# Altium PCB MotorDriver-v1.0.PcbDoc (part 1 of 3)
Units mil, origin at the board's own origin, x right, y up, seen from the top; angles counter-clockwise.
Board outline 4842.52 x 3661.42 mil, 2 copper layers (Top Layer, Bottom Layer), stack 57 mil thick; 127 components, 90 nets, 380 pads, 96 vias.
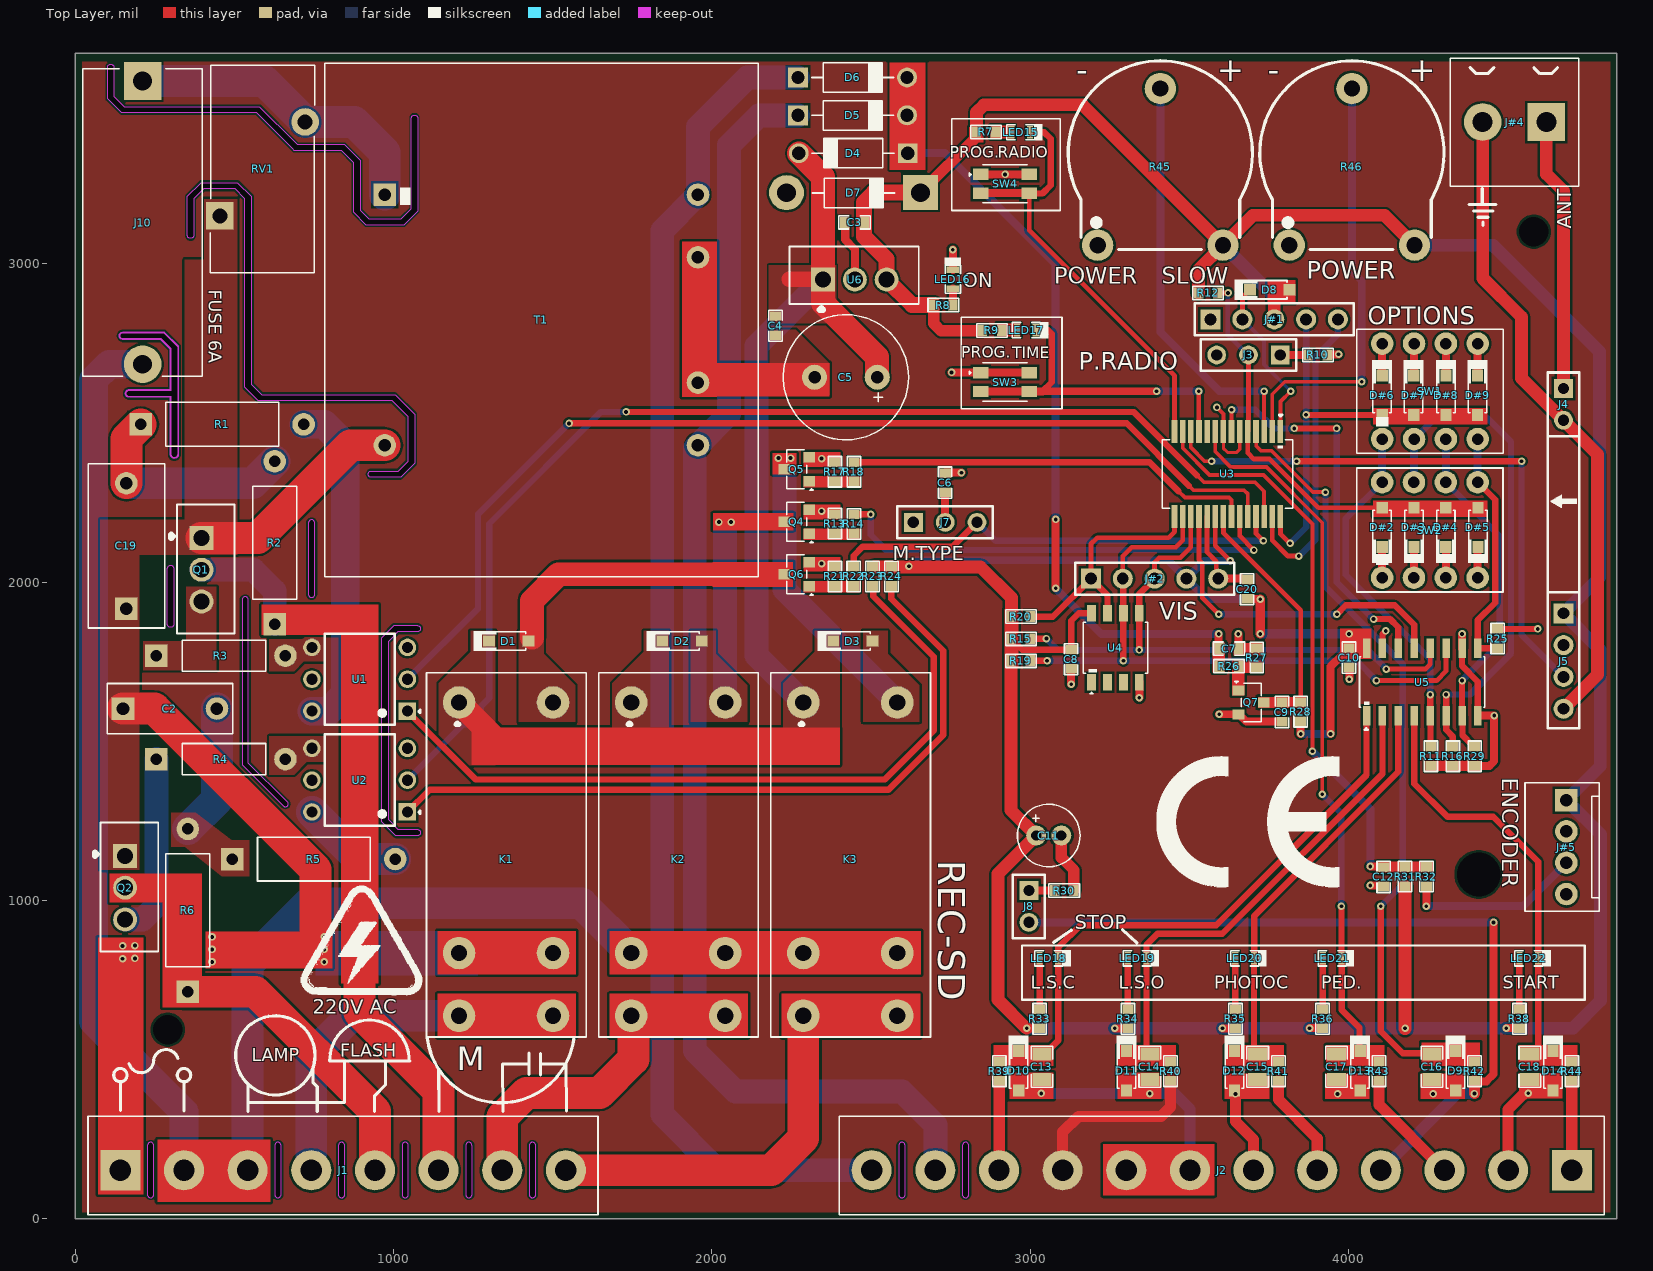
[diagram p0: Top Layer view]
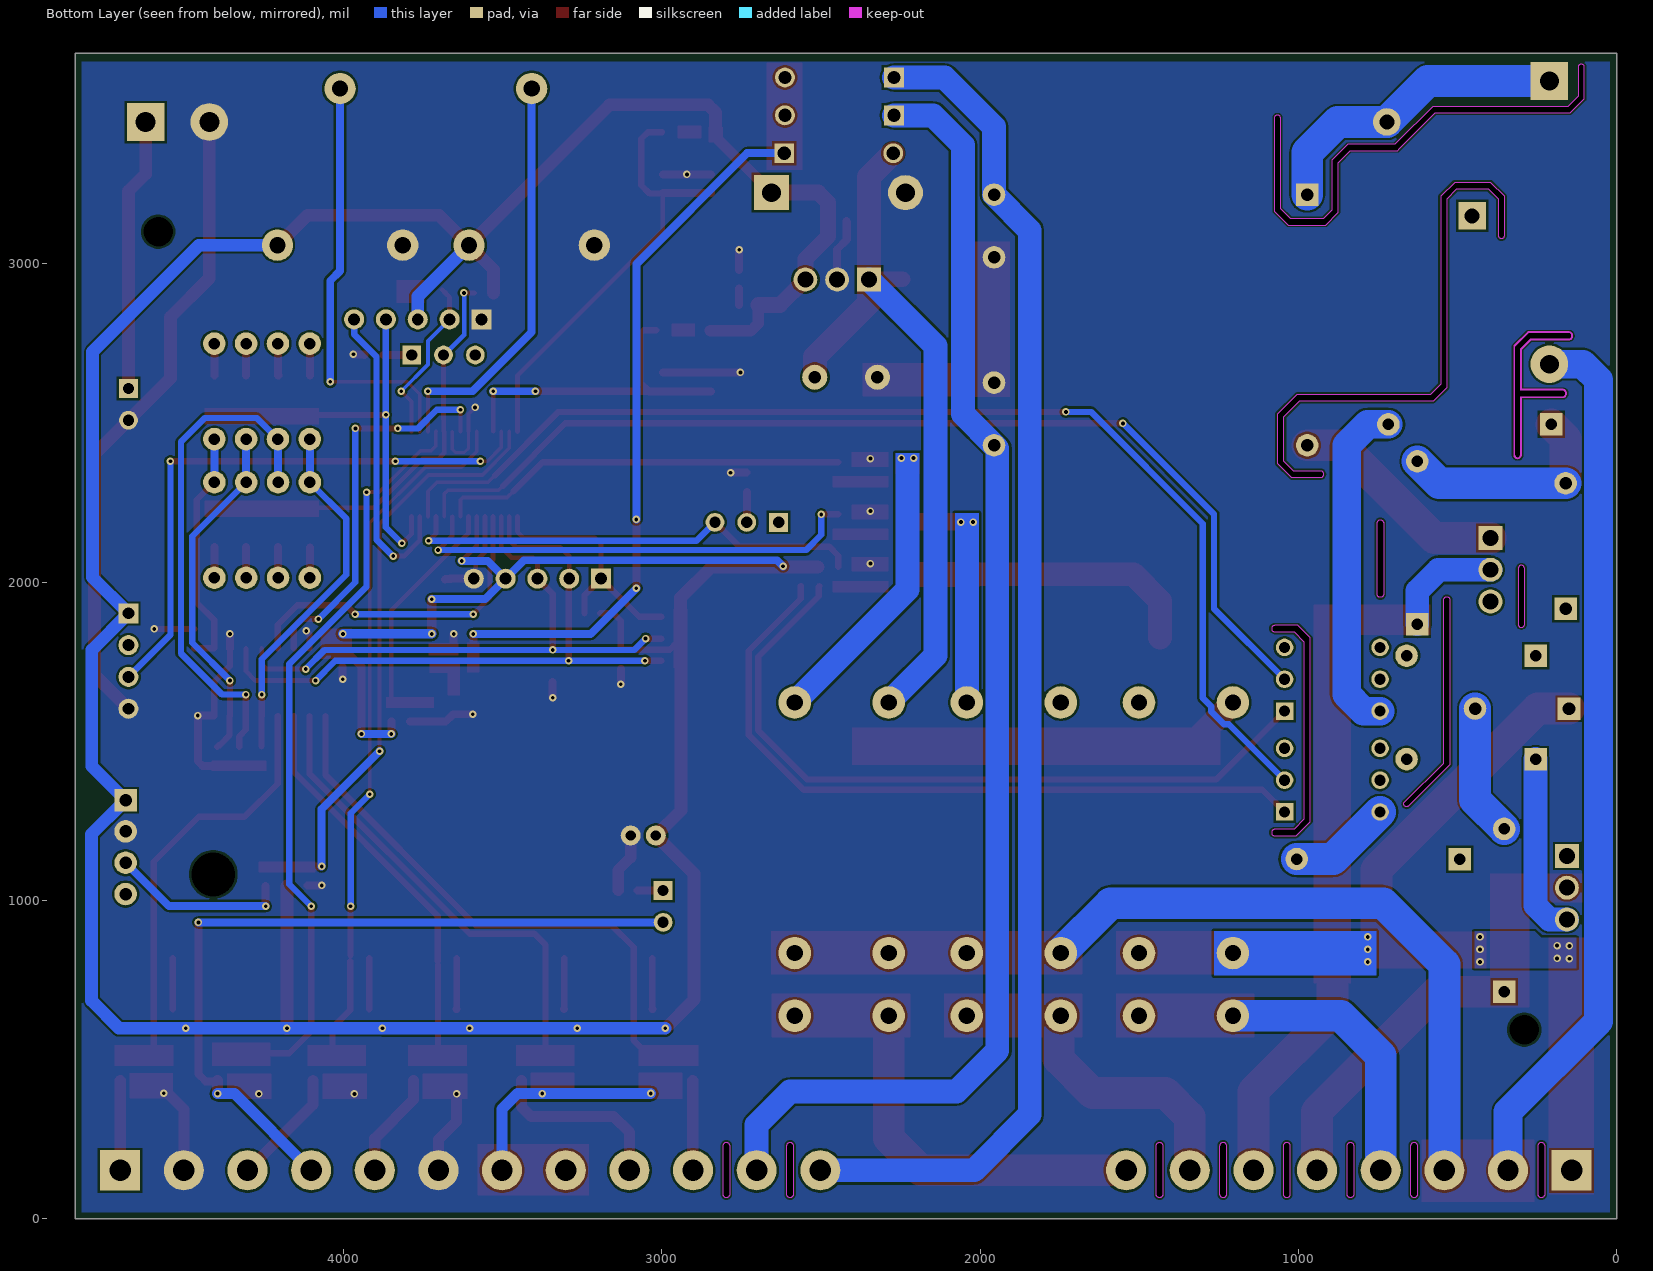
[diagram p1: Bottom Layer view, seen from below]
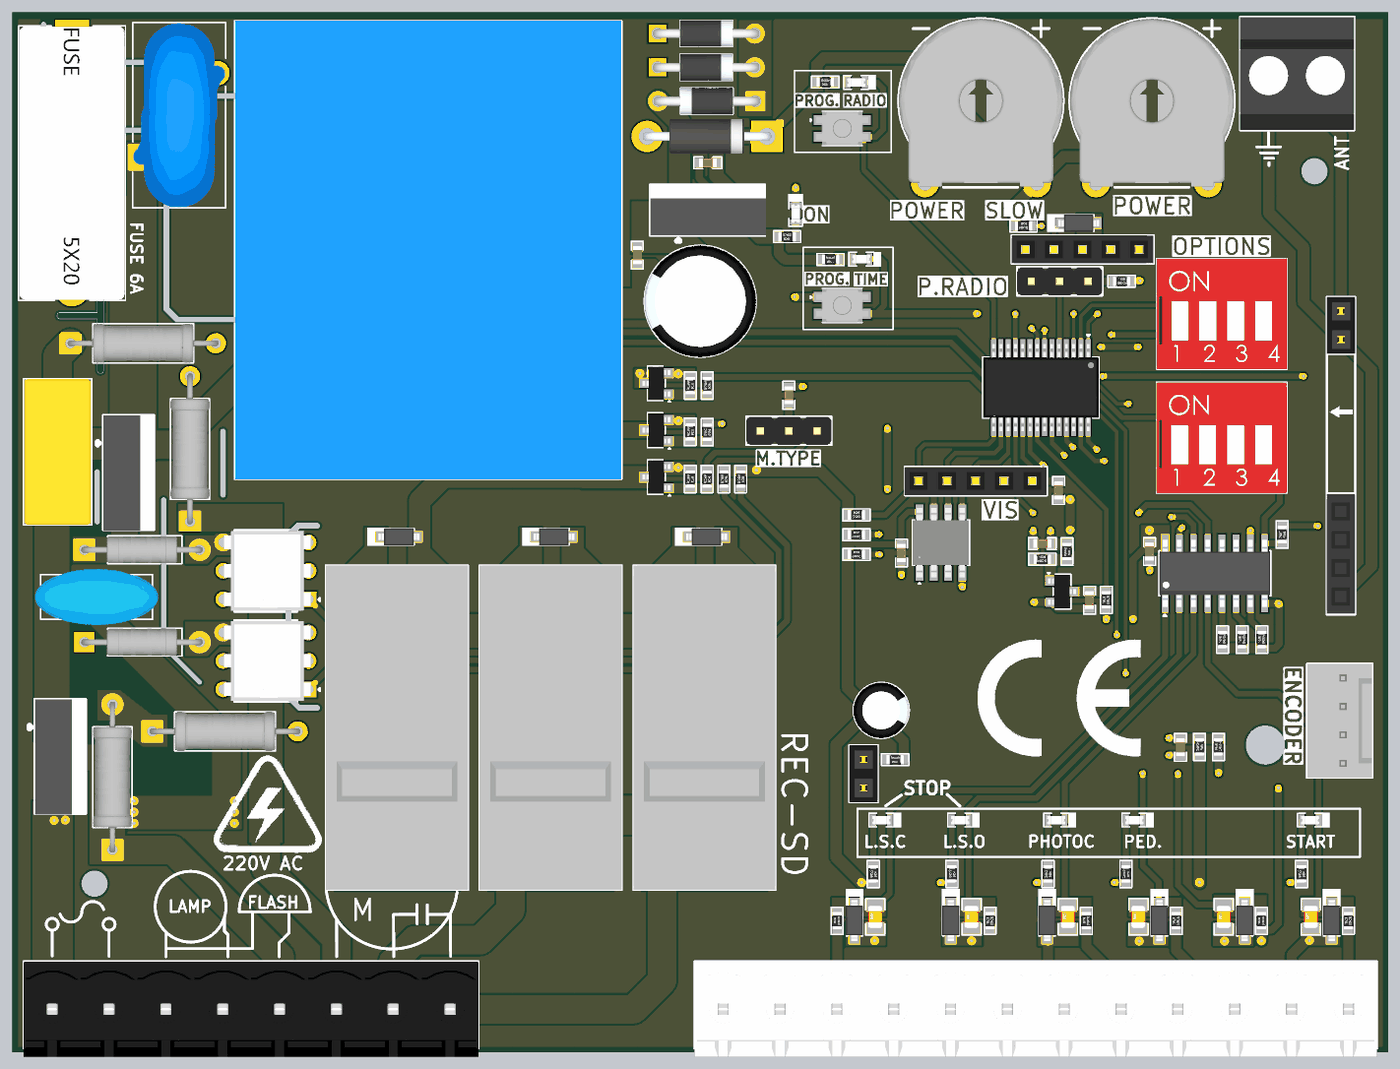
[diagram p3: 3D render of the assembled board from above, using the file's embedded part models]

## Layer stack, top to bottom
Top Solder: solder mask 3, Solder Resist, Dk 3.5
Top Layer: signal copper 10
Dielectric 1: dielectric 37, FR-4, Dk 4.8
Bottom Layer: signal copper 10
Bottom Solder: solder mask 3, Solder Resist, Dk 3.5

## Board outline
0,0 0,3661.42 4842.52,3661.42 4842.52,0
cut-out: 688,3356 682,3362 569.22,3474.78 144.71,3474.78 100.91,3518.58 100.78,3518.58 100.78,3617.83 cw(c110.78,3617.83) 110.78,3627.83 cw(c110.78,3617.83) 120.78,3617.83 120.78,3527.22 153.22,3494.78 578.22,3494.78 691.04,3381.96 697,3376 845,3376 895,3326 895,3168.53 921.49,3142.05 1024.12,3142.05 1055.46,3173.38 1055.46,3457.95 cw(c1065.46,3457.95) 1065.46,3467.95 cw(c1065.46,3457.95) 1075.46,3457.95 1075.46,3165.85 1031.66,3122.05 913.95,3122.05 874.15,3161.85 874.15,3317.85 836,3356
cut-out: 962.06,1246.8 962.06,1825.06 1001,1864 1074,1864 cw(c1074,1854) 1084,1854 cw(c1074,1854) 1074,1844 1013.4,1844 982.06,1812.67 982.06,1254.33 1013.4,1223 1074,1223 cw(c1074,1213) 1084,1213 cw(c1074,1213) 1074,1203 1005.86,1203
cut-out: 523.28,1426.72 651.5,1298.5 652.86,1297.52 ccw(c659.67,1303.33) 665.38,1310.22 664,1311 543.28,1431.72 543.28,1944.02 ccw(c533.28,1944.02) 533.28,1954.02 ccw(c533.28,1944.02) 523.28,1944.02
cut-out: 532,2612 532,3205.47 501.51,3235.95 402.88,3235.95 371.54,3204.62 371.54,3090.05 cw(c361.54,3090.05) 361.54,3080.05 cw(c361.54,3090.05) 351.54,3090.05 351.54,3212.15 395.34,3255.95 509.05,3255.95 552.85,3212.15 552.85,2622.15 586,2589 1005,2589 1065.67,2528.33 1065.67,2373.13 1021.87,2329.33 929.76,2329.33 cw(c929.76,2339.33) 919.76,2339.33 cw(c929.76,2339.33) 929.76,2349.33 1014.33,2349.33 1045.67,2380.67 1045.67,2520.33 996,2570 574,2570
cut-out: 169.1,2583.01 cw(c169.1,2593.01) 159.1,2593.01 cw(c169.1,2593.01) 169.1,2603.01 301,2603.01 301,2732.98 269.67,2764.31 150.1,2764.31 cw(c150.1,2774.31) 140.1,2774.31 cw(c150.1,2774.31) 150.1,2784.31 277.2,2784.31 321,2740.51 321,2401.1 320.69,2401.1 cw(c310.69,2401.1) 310.69,2391.1 cw(c310.69,2401.1) 300.69,2401.1 300.8,2401.1 300.8,2583.01
cut-out: 156.58,2593.01 cw(c169.1,2593.01) 167.13,2605.37 cw(c168,2603.01) 168,2605.52 298.49,2605.52 298.49,2731.94 268.63,2761.8 151,2761.8 cw(c151,2764.31) 150.55,2761.84 cw(c150.1,2764.31) 150.1,2761.8 cw(c150.1,2774.31) 137.58,2774.31 cw(c150.1,2774.31) 149.93,2786.82 cw(c150.1,2773.57) 150.1,2786.83 277.2,2786.83 cw(c277.2,2784.31) 278.98,2786.09 322.78,2742.29 cw(c321,2740.51) 323.51,2740.51 323.51,2604 cw(c321,2604) 323.31,2603.01 323.31,2401 cw(c320.8,2401) 323.17,2400.16 cw(c310.69,2401.1) 310.69,2388.58 cw(c310.69,2401.1) 298.17,2401.1 cw(c300.69,2401.1) 298.29,2401.84 cw(c300.78,2402) 298.28,2402 298.28,2580.49 169,2580.49 cw(c169,2583) 168.93,2580.49 cw(c169.1,2593.01)
cut-out: 299,1858 cw(c299,1868) 289,1868 289,2043.02 cw(c299,2043.02) 299,2053.02 cw(c299,2043.02) 309,2043.02 309,1868 cw(c299,1868)
cut-out: 732,1962 ccw(c742,1962) 742,1952 ccw(c742,1962) 752,1962 752,2186.02 ccw(c742,2186.02) 742,2196.02 ccw(c742,2186.02) 732,2186.02
cut-out: 2787.07,75.79 ccw(c2797.07,75.79) 2797.07,65.79 ccw(c2797.07,75.79) 2807.07,75.79 2807.07,229.81 ccw(c2797.07,229.81) 2797.07,239.81 ccw(c2797.07,229.81) 2787.07,229.81
cut-out: 2587.07,75.79 ccw(c2597.07,75.79) 2597.07,65.79 ccw(c2597.07,75.79) 2607.07,75.79 2607.07,229.81 ccw(c2597.07,229.81) 2597.07,239.81 ccw(c2597.07,229.81) 2587.07,229.81
cut-out: 1426.07,75.79 ccw(c1436.07,75.79) 1436.07,65.79 ccw(c1436.07,75.79) 1446.07,75.79 1446.07,229.81 ccw(c1436.07,229.81) 1436.07,239.81 ccw(c1436.07,229.81) 1426.07,229.81
cut-out: 1226.07,75.79 ccw(c1236.07,75.79) 1236.07,65.79 ccw(c1236.07,75.79) 1246.07,75.79 1246.07,229.81 ccw(c1236.07,229.81) 1236.07,239.81 ccw(c1236.07,229.81) 1226.07,229.81
cut-out: 1026.07,75.79 ccw(c1036.07,75.79) 1036.07,65.79 ccw(c1036.07,75.79) 1046.07,75.79 1046.07,229.81 ccw(c1036.07,229.81) 1036.07,239.81 ccw(c1036.07,229.81) 1026.07,229.81
cut-out: 826.07,75.79 ccw(c836.07,75.79) 836.07,65.79 ccw(c836.07,75.79) 846.07,75.79 846.07,229.81 ccw(c836.07,229.81) 836.07,239.81 ccw(c836.07,229.81) 826.07,229.81
cut-out: 626.07,75.79 ccw(c636.07,75.79) 636.07,65.79 ccw(c636.07,75.79) 646.07,75.79 646.07,229.81 ccw(c636.07,229.81) 636.07,239.81 ccw(c636.07,229.81) 626.07,229.81
cut-out: 226.07,75.79 ccw(c236.07,75.79) 236.07,65.79 ccw(c236.07,75.79) 246.07,75.79 246.07,229.81 ccw(c236.07,229.81) 236.07,239.81 ccw(c236.07,229.81) 226.07,229.81

## Design rules (kind name [scope] priority, off if disabled: settings)
Clearance [All] p1: gap=7 ignorepadtopadclearanceinfootprint=FALSE except(4: Arc-SMDPad Track-SMDPad SMDPad-SMDPad)
ComponentClearance [All] p1: gap=0 collisioncheckmode=3 verticalgap=0 showdistances=FALSE
Height [All] p1: minheight=0 maxheight=1500 prefheight=1000
HoleSize [All] p1: absolutevalues=TRUE maxlimit=1000 minlimit=1 maxpercent=80.000 minpercent=20.000
HoleToHoleClearance [All] p1: gap=0 allowstackedmicrovias=TRUE
MinimumSolderMaskSliver [All] p1: minsoldermaskwidth=0
PlaneConnect [All] p1: planeconnectstyle=Direct reliefexpansion=20 reliefentries=4 reliefconductorwidth=10 reliefairgap=10
PolygonConnect [All] p1: connectstyle=Direct reliefconductorwidth=10 reliefentries=4 polygonreliefangle="90 Angle" airgapwidth=10
RoutingVias [All] p1: holewidth=11.81 width=23.62 viastyle="Through Hole" minholewidth=11.81 minwidth=23.62 maxholewidth=31.5 maxwidth=62.99
SilkToSilkClearance [All] p1: silktosilkclearance=0
SilkToSolderMaskClearance [IsPad] p1: minsilkscreentomaskgap=0 clearancetoexposedcopper=TRUE
SolderMaskExpansion [All] p1: expansion=4 istentingtop=FALSE
Width [All] p1: maxlimit=150 minlimit=8 preferedwidth=15 minimp=50.000000 maximp=50.000000 favimp=50.000000
22 further rules are at their usual default settings.

## Components (designator, comment, footprint, x,y, rotation, side; value= is the part's Value field where it differs from the comment)
C2 "2.2nF" R08E1E222MN0B0S0N0 297,1603 r0 top locked
C3 "100nF" CAP-0603 2448,3131 r180 top locked
C4 "100nF" CAP-0603 2200,2806 r90 top locked
C5 "470uF" GR1V471M1013 2421,2644 r180 top locked
C6 "0.01uF" CAP-0603 2733,2313 r270 top locked
C7 "0.01uF" CAP-0603 3625,1791 r0 top locked
C8 "100nF" CAP-0603 3129,1758 r270 top locked
C9 "1nF" CAP-0603 3791,1592 r270 top locked
C10 "100nF" CAP-0603 4002,1763 r90 top locked
C11 "4.7uF" ERS1KM4R7D11OT 3058.37,1204 r0 top locked
C12 "0.01uF" CAP-0603 4111,1074 r270 top locked
C13 "220nF" CAP-0805 3037,477.4 r90 top locked
C14 "220nF" CAP-0805 3376,477.4 r90 top locked
C15 "220nF" CAP-0805 3715,477.4 r90 top locked
C16 "220nF" CAP-0805 4263,477.4 r90 top locked
C17 "220nF" CAP-0805 3963,477.4 r90 top locked
C18 "220nF" CAP-0805 4570,477.4 r90 top locked
C19 "0.1uF/275V" MPX104K31C3KN15600 160,2114 r90 top locked
C20 "100nF" CAP-0603 3682,1978 r270 top locked
D1 "1N4148W-7-F" SOD-123 1361,1815 r180 top locked value=2pF
D2 "1N4148W-7-F" SOD-123 1906,1815 r180 top locked value=2pF
D3 "1N4148W-7-F" SOD-123 2443.09,1815 r180 top locked value=2pF
D4 "1N4007" DO-41 2444.06,3348 r180 top locked
D5 "1N4007" DO-41 2442,3467 r0 top locked
D6 "1N4007" DO-41 2442,3586 r0 top locked
D7 "P6KE7.5A" DO-15 2445,3224 r180 top locked
D8 "1N4148W-7-F" SOD-123 3753,2919 r180 top locked value=2pF
D9 "1N4148W-7-F" SOD-123 4337,464.25 r90 top locked value=2pF
D10 "1N4148W-7-F" SOD-123 2964,464.25 r90 top locked value=2pF
D11 "1N4148W-7-F" SOD-123 3303,464.25 r90 top locked value=2pF
D12 "1N4148W-7-F" SOD-123 3642,464.25 r90 top locked value=2pF
D13 "1N4148W-7-F" SOD-123 4037,464.25 r90 top locked value=2pF
D14 "1N4148W-7-F" SOD-123 4643,464.25 r90 top locked value=2pF
D#2 "1N4148W-7-F" SOD-123 4106,2172 r270 top locked value=2pF
D#3 "1N4148W-7-F" SOD-123 4206,2172 r270 top locked value=2pF
D#4 "1N4148W-7-F" SOD-123 4306,2172 r270 top locked value=2pF
D#5 "1N4148W-7-F" SOD-123 4407,2172 r270 top locked value=2pF
D#6 "1N4148W-7-F" SOD-123 4106,2587 r90 top locked value=2pF
D#7 "1N4148W-7-F" SOD-123 4205,2587 r90 top locked value=2pF
D#8 "1N4148W-7-F" SOD-123 4307,2587 r90 top locked value=2pF
D#9 "1N4148W-7-F" SOD-123 4406,2587 r90 top locked value=2pF
J1 "DB2EVC-5.08-8P-GN" DB2EVC-5.08-8P-GN 841,152 r0 top locked
J2 "DB2EVC-5.08-12P-GN" DB2EVC-5.08-12P-GN 3602,152 r180 top locked
J3 "" HDR1X3_ 3786,2714 r180 top locked
J4 "DM254R-11-02-85" "HDR1X2 (FEMALE)" 4676,2559 r270 top locked
J5 "PPTC041LFBN-RC" "HDR1X4 FEMALE" 4676.07,1752.34 r270 top locked
J7 "B-2100S03P-A110" HDR1X3_ 2633,2188 r0 top locked
J8 "DNP" "HDR1X2 (FEMALE)" 2996,981 r270 top locked
J10 "0PTF0078P" 0PTF0078P 211,3130 r270 top locked
J#1 "DNP" "HDR 1X5 FEMALE" 3567,2826 r0 top locked
J#2 "DNP" "HDR 1X5 FEMALE" 3191,2011 r0 top locked
J#4 "DB128L-5.08-2P-BK-S" DB128L-5.08-2P-BK-S 4522,3446 r180 top locked
J#5 "M2510V-04P" M2510V-04P 4685,1167.64 r270 top locked
K1 "G5RL-1A-E-HRDC12" G5RL-1A-E-HRDC12 1353,1129.94 r270 top locked
K2 "G5RL-1A-E-HRDC12" G5RL-1A-E-HRDC12 1893.82,1129.94 r270 top locked
K3 "G5RL-1A-E-HRDC12" G5RL-1A-E-HRDC12 2434.82,1129.94 r270 top locked
LED15 "Blue" LED-0603 2970,3414 r0 top locked
LED16 "Blue" LED-0603 2757,2952 r90 top locked
LED17 "Blue" LED-0603 2988,2792 r0 top locked
LED18 "Blue" LED-0603 3059,818 r0 top locked
LED19 "Blue" LED-0603 3336,818 r0 top locked
LED20 "Blue" LED-0603 3674,818 r0 top locked
LED21 "Blue" LED-0603 3949,818 r0 top locked
LED22 "Blue" LED-0603 4567,818 r0 top locked
Q1 "BTA16-600BRG" TO-220 396,2039 r270 top locked
Q2 "BTA16-600BRG" TO-220 156,1040 r270 top locked
Q4 "BC817 6B 160-400" SOT-23 2267,2190 r90 top locked
Q5 "BC817 6B 160-400" SOT-23 2267,2355 r90 top locked
Q6 "BC817 6B 160-400" SOT-23 2267,2025 r90 top locked
Q7 "BC817 6B 160-400" SOT-23 3694,1622 r270 top locked
R1 "390R" TH390R 461,2496 r0 top locked
R2 "390R" TH390R 626,2124 r90 top locked
R3 "0R" MFR50S-T-52-0R 457,1769 r0 top locked
R4 "0R" MFR50S-T-52-0R 457,1444 r0 top locked
R5 "390R" TH390R 749,1130 r0 top locked
R6 "390R" TH390R 353,968.91 r90 top locked
R7 "1K" RES-0603 2861,3415 r0 top locked
R8 "1K" RES-0603 2727,2871 r0 top locked
R9 "1K" RES-0603 2880,2791 r0 top locked
R10 "1.5K" RES-0603 3904,2714 r180 top locked
R11 "100K" RES-0603 4259,1453 r270 top locked
R12 "33K" RES-0603 3559,2909 r180 top locked
R13 "15K" RES-0603 2386,2184 r90 top locked value=15kR
R14 "3.3K" RES-0603 2446,2183 r90 top locked
R15 "3.3K" RES-0603 2971,1822 r180 top locked
R16 "100K" RES-0603 4328,1453 r270 top locked
R17 "15K" RES-0603 2386,2347 r90 top locked value=15kR
R18 "3.3K" RES-0603 2446,2347 r90 top locked
R19 "3.3K" RES-0603 2971,1753 r180 top locked
R20 "3.3K" RES-0603 2971,1892 r180 top locked
R21 "15K" RES-0603 2386,2018 r90 top locked value=15kR
R22 "3.3K" RES-0603 2445.33,2018 r90 top locked
R23 "220R" RES-0603 2504.67,2018 r90 top locked
R24 "220R" RES-0603 2564,2018 r90 top locked
R25 "100K" RES-0603 4469,1823 r90 top locked
R26 "10K" RES-0603 3625,1736 r180 top locked
R27 "10K" RES-0603 3712,1763 r90 top locked
R28 "33K" RES-0603 3850,1593 r270 top locked
R29 "100K" RES-0603 4397,1453 r270 top locked
R30 "8.2K" RES-0603 3107,1031 r0 top locked value=8.2kR
R31 "10K" RES-0603 4178,1075 r90 top locked
R32 "150R" RES-0603 4245,1075 r270 top locked
R33 "1.5K" RES-0603 3030,628 r90 top locked
R34 "1.5K" RES-0603 3307,628 r90 top locked
R35 "1.5K" RES-0603 3645,628 r90 top locked
R36 "1.5K" RES-0603 3919,628 r90 top locked
R38 "1.5K" RES-0603 4537,628 r90 top locked
R39 "100R" RES-0603 2903,463.4 r270 top locked
R40 "100R" RES-0603 3441,463.4 r270 top locked
R41 "100R" RES-0603 3780,463.4 r270 top locked
R42 "100R" RES-0603 4396,463.4 r270 top locked
R43 "100R" RES-0603 4096,463.4 r270 top locked
R44 "100R" RES-0603 4702,463.4 r270 top locked
R45 "100K" PT15-L-V-104(100K) 3409,3305 r0 top locked
R46 "100K" PT15-L-V-104(100K) 4011,3305 r0 top locked
RV1 "14D431K" 14D431K 587.86,3298.64 r90 top locked
SW1 "DS-04-R-T" DS-04-R-T 4256.3,2599.68 r90 top locked
SW2 "DS-04-R-T" DS-04-R-T 4256,2164 r90 top locked
SW3 "TS-1185EC-C-D-B" TS-1185EC-C-D-B_ 2921,2629 r0 top locked
SW4 "TS-1185EC-C-D-B" TS-1185EC-C-D-B_ 2921,3252 r0 top locked
T1 "PE3817-M 12V-0V-12V" "PE3817-M 12V-0V-12V" 1464,2824 r0 top locked
U1 "MOC3022" "6 PIN DIP" 893,1695 r180 top locked
U2 "MOC3063" "6 Pin Dip" 893,1378 r180 top locked
U3 "PIC16F886-I/SS" SSOP-28-208mil 3620,2340 r270 top locked
U4 "FT24C16A-ESR-T" SOP-8 3268,1794 r90 top locked
U5 "CD4512BM" SOIC-16 4232,1686 r90 top locked
U6 "L7805ABV" TO-220 2449,2951 r0 top locked

## Footprints (in the part's own frame and the unit in brackets; to place one, negate y for a bottom-side part, rotate by r counter-clockwise, add the part's x,y. Pads: shape width x height; smd on the part's side, far side on the other; paste and mask are expansions set on the pad)
0PTF0078P [mm]
  rect 3x3 hole 1.5: 1(-11.3,0)
  round 3 hole 1.5: 2(11.3,0)
  silkscreen extent -12.27,-4.78 12.27,4.78, body extent -12.2,-4.7 12.2,4.7, height 11.5
"6 PIN DIP" [mm]
  rect 1.4x1.4 hole 0.9: 1(-3.81,2.54)
  round 1.4 hole 0.9: 2(-3.81,0) 3(-3.81,-2.54) 4(3.81,-2.54) 5(3.81,0) 6(3.81,2.54)
  silkscreen extent -4.83,-3.65 2.8,3.65, body extent -4.06,-3.56 3.81,3.56, height 4.8
"6 Pin Dip" [mm]
  rect 1.4x1.4 hole 0.9: 1(-3.81,2.54)
  round 1.4 hole 0.9: 2(-3.81,0) 3(-3.81,-2.54) 4(3.81,-2.54) 5(3.81,0) 6(3.81,2.54)
  silkscreen extent -4.83,-3.65 2.8,3.65, body extent -4.06,-3.56 3.81,3.56, height 4.8
14D431K [mm]
  rect 2.2x2.2 hole 1.2: 1(-3.75,3.4)
  round 2.2 hole 1.2: 2(3.75,-3.4)
  silkscreen extent -8.28,-4.17 8.28,4.17, body extent -8.24,-4.11 8.24,4.11, height 17.6
CAP-0603 [mil]
  rect 30x35 smd mask+2.36: 1(-30,0) 2(30,0)
  silkscreen extent -49,-21 49,21, body extent -32,-16 31,16, height 34
CAP-0805 [mil] "SMD 0805"
  rect 40x60 smd mask+2.76: 1(-40,0) 2(40,0)
  silkscreen extent -64,-34 64,34, body extent -39,-25 39,25, height 30
DB2EVC-5.08-8P-GN [mm]
  rect 3.2x3.2 hole 1.7: 1(-17.78,0)
  round 3.2 hole 1.7: 2(-12.7,0) 3(-7.62,0) 4(-2.54,0) 5(2.54,0) 6(7.62,0) 7(12.7,0) 8(17.78,0)
  silkscreen extent -20.36,-3.54 20.35,4.3, body extent -20.32,-4.25 20.32,4.25, height 12
DB2EVC-5.08-12P-GN [mm]
  rect 3.2x3.2 hole 1.7: 1(-27.94,0)
  round 3.2 hole 1.7: 2(-22.86,0) 3(-17.78,0) 4(-12.7,0) 5(-7.62,0) 6(-2.54,0) 7(2.54,0) 8(7.62,0) 9(12.7,0) 10(17.78,0) 11(22.86,0) 12(27.94,0)
  silkscreen extent -30.52,-4.3 30.52,3.54, body extent -30.48,-4.25 30.48,4.25, height 12
DB128L-5.08-2P-BK-S [mm]
  rect 3x3 hole 1.6: 1(-2.54,0)
  round 3 hole 1.6: 2(2.54,0)
  silkscreen extent -5.13,-5.08 5.13,5.13, body extent -5.08,-5.03 5.13,5.07, height 10.3
DO-15 [mm]
  rect 2.8x2.8 hole 1.5: 1(-5.35,0)
  round 2.8 hole 1.5: 2(5.35,0)
  silkscreen extent -3.3,-1.15 3.28,1.2, body extent -5.75,-1.55 5.75,1.55, height 3.1
DO-41 [mm]
  rect 1.59x1.59 hole 1.06: 1(-4.35,0)
  round 1.59 hole 1.06: 2(4.35,0)
  silkscreen extent -3.27,-1.17 3.3,1.17, body extent -4.75,-1.2 4.75,1.19, height 2.4
DS-04-R-T [mm]
  round 1.8 hole 0.92: 1(-3.81,3.81) 2(3.81,3.81) 3(-3.81,1.27) 4(3.81,1.27) 5(-3.81,-1.27) 6(3.81,-1.27) 7(-3.81,-3.81) 8(3.81,-3.81)
  silkscreen extent -4.95,-5.84 4.95,5.84, body extent -4.95,-5.84 4.95,5.84, height 6.7
ERS1KM4R7D11OT [mm]
  round 1.6 hole 0.82: 1(-1,0) 2(1,0)
  silkscreen extent -2.5,-2.5 2.5,2.5, body extent -2.5,-2.49 2.5,2.5, height 6.96
G5RL-1A-E-HRDC12 [mm]
  round 2.6 hole 1.3: 1(-12.5,-3.75) 3(7.5,-3.75) 4(12.5,-3.75) 5(12.5,3.75) 6(7.5,3.75) 8(-12.5,3.75)
  silkscreen extent -14.86,-6.35 14.2,6.4, body extent -14.83,-6.32 14.17,6.38, height 15.7
GR1V471M1013 [mm]
  round 2 hole 1: 1(-2.5,0) 2(2.5,0)
  silkscreen extent -5,-5 5,5, body extent -4.99,-5 5,5, height 24.91
"HDR1X2 (FEMALE)" [mm]
  rect 1.5x1.5 hole 0.9: 1(-1.27,0)
  round 1.5 hole 0.9: 2(1.27,0)
  silkscreen extent -2.54,-1.27 2.54,1.27, body extent -2.54,-1.27 2.54,1.27, height 8.8
HDR1X3_ [mm] "Connector; Header; 3 Position"
  rect 1.5x1.5 hole 0.9: 1(0,0)
  round 1.5 hole 0.9: 2(2.54,0) 3(5.08,0)
  silkscreen extent -1.27,-1.27 6.35,1.27, body extent -1.27,-1.24 6.35,1.25, height 8.54
"HDR1X4 FEMALE" [mm]
  rect 1.6x1.6 hole 0.95: 1(-3.81,0)
  round 1.6 hole 0.95: 2(-1.27,0) 3(1.27,0) 4(3.81,0)
  silkscreen extent -5.49,-1.27 5.36,1.27, body extent -5.38,-1.3 5.28,1.24, height 8.5
"HDR 1X5 FEMALE" [mm]
  rect 1.6x1.6 hole 0.95: 1(0,0)
  round 1.6 hole 0.95: 2(2.54,0) 3(5.08,0) 4(7.62,0) 5(10.16,0)
  silkscreen extent -1.27,-1.27 11.43,1.27, body extent -1.3,-1.24 11.4,1.26, height 8.4
LED-0603 [mm]
  rect 0.5x1 smd: 1(-0.75,0) 2(0.75,0)
  silkscreen extent -1.12,-0.66 1.75,0.66, body extent -0.82,-0.37 0.82,0.36, height 0.68
M2510V-04P [mm]
  rect 1.8x1.8 hole 1: 1(-3.75,0)
  round 1.8 hole 1: 2(-1.25,0) 3(1.25,0) 4(3.75,0)
  silkscreen extent -5.13,-3.3 5.13,2.62, body extent -5.08,-3.25 5.08,2.55, height 11.7
MFR50S-T-52-0R [mm]
  rect 1.8x1.8 hole 0.92: 1(-5.15,0)
  round 1.8 hole 0.92: 2(5.15,0)
  silkscreen extent -3.07,-1.24 3.58,1.24, body extent -5.43,-1.19 5.43,1.19, height 2.4
MPX104K31C3KN15600 [mm]
  rect 1.8x1.8 hole 1: 1(-5,0)
  round 1.8 hole 1: 2(5,0)
  silkscreen extent -6.55,-3.05 6.55,3.05, body extent -6.5,-3 6.5,3, height 12
"PE3817-M 12V-0V-12V" [mm]
  rect 1.8x1.8 hole 1: 1(-12.5,10)
  round 1.8 hole 1: 5(-12.5,-10) 6(12.5,-10) 7(12.5,-5) 9(12.5,5) 10(12.5,10)
  silkscreen extent -17.3,-20.5 17.3,20.5, body extent -17.25,-20.5 17.25,20.5, height 30.8
PT15-L-V-104(100K) [mm]
  round 2.5 hole 1.3: 1(-5,-6.25) 2(0,6.25) 3(5,-6.25)
  silkscreen extent -7.35,-6.6 7.35,8.47, body extent -7.35,-6.53 7.35,8.46, height 7.2
R08E1E222MN0B0S0N0 [mm]
  rect 1.8x1.8 hole 1 paste+0 mask+0.051: 1(-3.75,0)
  round 1.8 hole 1 paste+0 mask+0.051: 2(3.75,0)
  silkscreen extent -5,-2 5,2, body extent -5.5,-2.5 5.5,2.5, height 11.5
RES-0603 [mil]
  rect 30x35 smd: 1(-30,0) 2(30,0)
  silkscreen extent -48,-21 48,21, body extent -31,-17 31,17, height 18
SOD-123 [mm]
  rect 0.95x0.9 smd: 1(-1.575,0) 2(1.575,0)
  silkscreen extent -1.37,-0.8 2.82,0.8, body extent -1.82,-0.78 1.83,0.78, height 1.5
SOIC-16 [mm]
  rect 1.55x0.6 smd: 1(-2.7,4.445) 2(-2.7,3.175) 3(-2.7,1.905) 4(-2.7,0.635) 5(-2.7,-0.635) 6(-2.7,-1.905) 7(-2.7,-3.175) 8(-2.7,-4.445) 9(2.7,-4.445) 10(2.7,-3.175) 11(2.7,-1.905) 12(2.7,-0.635) 13(2.7,0.635) 14(2.7,1.905) 15(2.7,3.175) 16(2.7,4.445)
  silkscreen extent -3.82,-5 2.03,5, body extent -3,-4.95 3,4.95, height 1.75
SOP-8 [mm]
  rect 1.3x0.7 smd: 1(-2.75,1.905) 2(-2.75,0.635) 3(-2.75,-0.635) 4(-2.75,-1.905) 5(2.75,-1.905) 6(2.75,-0.635) 7(2.75,0.635) 8(2.75,1.905)
  silkscreen extent -3.69,-2.57 2.03,2.57, body extent -3.1,-2.5 3.1,2.5, height 1.76
SOT-23 [mm] "TRANS NPN 40V 0.6A SOT23"
  rect 0.82x0.92 smd: 1(-0.95,-1) 2(0.95,-1) 3(0,1)
  silkscreen extent -1.68,-1.3 1.55,0.81, body extent -1.5,-1.25 1.5,1.25, height 1.05
SSOP-28-208mil [mm]
  rect 1.85x0.45 smd: 1(-3.4,4.225) 2(-3.4,3.575) 3(-3.4,2.925) 4(-3.4,2.275) 5(-3.4,1.625) 6(-3.4,0.975) 7(-3.4,0.325) 8(-3.4,-0.325) 9(-3.4,-0.975) 10(-3.4,-1.625) 11(-3.4,-2.275) 12(-3.4,-2.925) 13(-3.4,-3.575) 14(-3.4,-4.225) 15(3.4,-4.225) 16(3.4,-3.575) 17(3.4,-2.925) 18(3.4,-2.275) 19(3.4,-1.625) 20(3.4,-0.975) 21(3.4,-0.325) 22(3.4,0.325) 23(3.4,0.975) 24(3.4,1.625) 25(3.4,2.275) 26(3.4,2.925) 27(3.4,3.575) 28(3.4,4.225)
  silkscreen extent -4.72,-5.21 2.72,5.21, body extent -3.88,-5.17 3.88,5.17, height 2.15
TH390R [mm]
  rect 1.8x1.8 hole 0.92: 1(-6.5,0)
  round 1.8 hole 0.92: 2(6.5,0)
  silkscreen extent -4.5,-1.75 4.5,1.75, body extent -6.75,-1.75 6.75,1.75, height 3.5
TO-220 [mm]
  rect 1.91x1.91 hole 1.27: 1(-2.54,0)
  round 1.91 hole 1.27: 2(0,0) 3(2.54,0)
  silkscreen extent -5.21,-2.41 5.1,2.64, body extent -5.15,-1.91 5.15,2.67, height 22.72
TS-1185EC-C-D-B_ [mm]
  rect 1.25x0.9 smd: 1(-1.925,0.75) 1(1.925,0.75) 2(-1.925,-0.75) 2(1.925,-0.75)
  silkscreen extent -2.84,-1.52 1.78,1.52, body extent -2.33,-1.5 2.32,1.5, height 2

## Part data
C2: library part R08E1E222MN0B0S0N0, "±20% 2.2nF Y5U 2kV Plugin,P=7.5mm Ceramic Disc Capacitors ROHS", LCSC Part Number=C2914748, Manufacturer=STE, Package=Plugin,P=7.5mm, ComponentLink1Description=LCSC, ComponentLink1URL=https://www.lcsc.com/product-detail/Ceramic-Disc-Capacitors_STE-Songtian-Elec-R08E1E222MN0B0S0N0_C2914748.html, Item Type="Ceramic Disc Capacitor", Manufacturer Part Number=R08E1E222MN0B0S0N0
C3 C4 C8 C10 C20: library part CC0603KRX5R9BB104, "CAP CER 0.1UF 50V X5R 0603", Case Code (Imperial)=0603, Case Code (Metric)=1608, Dielectric=X5R, LCSC Part Number=C110022, Manufacturer=Yageo, Max Operating Temperature=85°C, Min Operating Temperature=-55°C, Package Quantity=4000, Supplier Part Number 1=311-4046-1-ND, Tolerance=10%, Voltage Rating=50V, Capacitance=100nF, Case/Package=0603, Category="Ceramic Capacitors", ComponentLink1Description=http://www.mouser.com/ds/2/447/Yageo_UPY-GP_NP0_16V-to-50V_9-358835.pdf?src-supplier=Mouser, ComponentLink1URL=http://www.mouser.com/ds/2/447/Yageo_UPY-GP_NP0_16V-to-50V_9-358835.pdf?src-supplier=Mouser, ComponentLink2Description=https://www.yageo.com/upload/media/product/productsearch/datasheet/mlcc/UPY-GPHC_X5R_4V-to-50V_26.pdf?src-supplier=Digi-Key, ComponentLink2URL=https://www.yageo.com/upload/media/product/productsearch/datasheet/mlcc/UPY-GPHC_X5R_4V-to-50V_26.pdf?src-supplier=Digi-Key, ComponentLink3Description=http://www.yageo.com/exep/pages/download/literatures/ProductSelectionGuide%202014_Final_2.pdf?src-supplier=Digi-Key, ComponentLink3URL=http://www.yageo.com/exep/pages/download/literatures/ProductSelectionGuide%202014_Final_2.pdf?src-supplier=Digi-Key, Halogen Free="Halogen Free", Item Type=Capacitor, Lead Free="Lead Free", Length=0.063inch, Manufacturer Part Number=CC0603KRX5R9BB104, Mount="Surface Mount", Packaging="Tape and Reel", Pricing 1="1=0.10000, 10=0.05200, 50=0.02820, 100=0.02310, 500=0.01648, 1000=0.01294 (USD)", RoHS=Yes, Stock 1=152253, Supplier 1=Digi-Key, Termination=SMD/SMT, Thickness=0.035inch, Voltage Rating (DC)=50V, Weight=7.1E-05oz, Width=0.031inch
C5: library part GR1V471M1013, "470uF 35V ±20% Plugin,D10xL13mm Aluminum Electrolytic Capacitors - Leaded ROHS", LCSC Part Number=C2873995, Manufacturer=ROQANG, Package=Plugin,D10xL13mm, ComponentLink1Description=LCSC, ComponentLink1URL=https://www.lcsc.com/product-detail/span-style-background-color-ff0-Aluminum-span-span-style-background-color-ff0-Electrolytic-span-span-style-background-color-ff0-Capacitors-span-span-style-background-color-ff0-Leaded-span_ROQANG-GR1V471M1013_C2873995.html, Item Type=Capacitor, Manufacturer Part Number=GR1V471M1013
C6 C7 C12: library part GRM1885C1H103JA01D, "CAP CER 10000PF 50V C0G/NP0 0603", Capacitance=10nF, Case Code (Imperial)=0603, Case Code (Metric)=1608, Dielectric=C0G, Manufacturer=Murata, Max Operating Temperature=125°C, Min Operating Temperature=-55°C, Package Quantity=4000, Supplier Part Number 1=1449032, Tolerance=5%, Voltage=50V, Case/Package=0603, Category="Ceramic Capacitors", ComponentLink1Description=https://datasheet.ciiva.com/41860/partnumbering-e-01-41860759.pdf?src-supplier=Digi-Key, ComponentLink1URL=https://datasheet.ciiva.com/41860/partnumbering-e-01-41860759.pdf?src-supplier=Digi-Key, ComponentLink2Description=https://datasheet.ciiva.com/29537/partnumbering-e-01-29537910.pdf?src-supplier=Digi-Key, ComponentLink2URL=https://datasheet.ciiva.com/29537/partnumbering-e-01-29537910.pdf?src-supplier=Digi-Key, Depth=0.8mm, Height=0.8mm, Lead Free="Lead Free", Lead Pitch=0.5mm, Length=1.6mm, Manufacturer Part Number=GRM1885C1H103JA01D, Material=Ceramic, Mount="Surface Mount", Packaging="Tape and Reel", Pricing 1="4000=0.03500, 8000=0.03200 (GBP)", REACH SVHC="No SVHC", RoHS=Yes, RoHS Compliant=Yes, Series=GRM, Stock 1=80000, Supplier 1=RSComponents, Termination=SMD/SMT, Thickness=0.035inch, Voltage Rating=50V, Voltage Rating (DC)=50V, Width=0.8mm
C9: library part CC0603KRX7R8BB102, "CAP CER 0603 1nF 25 V ±10 % Tolerance X7R SMT", Case Code (Imperial)=0603, Case Code (Metric)=1608, Dielectric=X7R, LCSC Part Number=C519404, Manufacturer=Yageo, Max Operating Temperature=125°C, Min Operating Temperature=-55°C, Resistor Type=Ceramic, Tolerance=10%, Voltage Rating=25V, Capacitance=1nF, Case/Package=0603, Category="Ceramic Capacitors", ComponentLink1Description=https://datasheet.ciiva.com/13263/upy-gphc-x7r-6-3v-to-50v-8-12304-13263372.pdf?src-supplier=Mouser, ComponentLink1URL=https://datasheet.ciiva.com/13263/upy-gphc-x7r-6-3v-to-50v-8-12304-13263372.pdf?src-supplier=Mouser, Construction=Flat, Depth=0.8mm, Halogen Free="Halogen Free", Height=0.8mm, Lead Free="Lead Free", Length=1.6mm, Manufacturer Part Number=CC0603KRX7R8BB102, Mount="Surface Mount", Packaging="Tape and Reel", Pricing 1="1=0.07500, 10=0.04120, 25=0.04030, 100=0.02020, 250=0.02000, 500=0.01320 (USD)", Radiation Hardening=No, RoHS=Yes, RoHS Compliant=Yes, Series=CC, Stock 1=974, Supplier 1="Arrow Electronics", Supplier Part Number 1=CC0603KRX7R8BB102, Termination=SMD/SMT, Thickness=0.035inch, Voltage Rating (DC)=25V, Weight=7.1E-05oz, Width=0.031inch
C11: library part ERS1KM4R7D11OT, "4.7uF 100V ±20% Plugin,D5xL11mm Aluminum Electrolytic Capacitors - Leaded ROHS", LCSC Part Number=C106689, Manufacturer="AISHI(Aihua Group)", Package=Plugin,D5xL11mm, ComponentLink1Description=LCSC, ComponentLink1URL=https://www.lcsc.com/product-detail/Aluminum-Electrolytic-Capacitors-Leaded_AISHI-Aihua-Group-ERS1KM4R7D11OT_C106689.html, Item Type=Capacitor, Manufacturer Part Number=ERS1KM4R7D11OT
C13 C14 C15 C16 C17 C18: library part 08051C224K4T2A, "CAP CER 0.22UF 100V X7R 0805", Case/Package=0805, Dielectric=X7R, LCSC Part Number=C2176107, Manufacturer="Kyocera AVX", Max Operating Temperature=125°C, Min Operating Temperature=-55°C, Supplier Part Number 1=478-13049-1-ND, Tolerance=10%, Voltage Rating (DC)=100V, Capacitance=220nF, Category="Ceramic Capacitors", ComponentLink1Description=http://datasheets.avx.com/AutoMLCC.pdf?src-supplier=Avnet+Asia, ComponentLink1URL=http://datasheets.avx.com/AutoMLCC.pdf?src-supplier=Avnet+Asia, Contact Plating=Tin, Item Type=Capacitor, Length=2.01mm, Manufacturer Part Number=08051C224K4T2A, Mount="Surface Mount", Pricing 1="1=0.27000, 10=0.18500, 50=0.12320, 100=0.10470, 500=0.07392, 1000=0.06468 (USD)", RoHS=Yes, RoHS Compliant=Yes, Stock 1=151, Supplier 1=Digi-Key, Termination=Wraparound
C19: library part MPX104K31C3KN15600, "100nF ±10% X2 Plugin,P=10mm Suppression Capacitors ROHS", LCSC Part Number=C489079, Manufacturer=KNSCHA, Package=Plugin,P=10mm, ComponentLink1Description=LCSC, ComponentLink1URL=https://www.lcsc.com/product-detail/Suppression-Capacitors_KNSCHA-MPX104K31C3KN15600_C489079.html, Item Type=Capacitor, Manufacturer Part Number=MPX104K31C3KN15600
D1 D2 D3 D8 D9 D10 D11 D12 D13 D14 D#2 D#3 D#4 D#5 D#6 D#7 D#8 D#9: "DIODE GEN PURP 100V 300MA SOD123", Average Rectified Current=300mA, Current Rating=150mA, Forward Voltage=1.25V, LCSC Part Number=C83528, Manufacturer=Diodes, Max Forward Surge Current (Ifsm)=2A, Max Operating Temperature=150°C, Max Repetitive Reverse Voltage (Vrrm)=100V, Max Reverse Current=1uA, Min Operating Temperature=-65°C, Package Quantity=3000, Power Dissipation=400mW, Supplier Part Number 1=7634694, Voltage Rating (DC)=75V, Category="Rectifier Diodes", ComponentLink1Description=https://datasheet.ciiva.com/1179/1915529-1179304.pdf?src-supplier=Element14, ComponentLink1URL=https://datasheet.ciiva.com/1179/1915529-1179304.pdf?src-supplier=Element14, ComponentLink2Description=https://datasheet.ciiva.com/22695/1915529-22695239.pdf?src-supplier=Element14, ComponentLink2URL=https://datasheet.ciiva.com/22695/1915529-22695239.pdf?src-supplier=Element14, ComponentLink3Description=https://datasheet.ciiva.com/8300/ds30086-8300392.pdf?src-supplier=Avnet, ComponentLink3URL=https://datasheet.ciiva.com/8300/ds30086-8300392.pdf?src-supplier=Avnet, ComponentLink4Description=https://datasheet.ciiva.com/15219/getdatasheetpartid-110030-15219548.pdf?src-supplier=Verical, ComponentLink4URL=https://datasheet.ciiva.com/15219/getdatasheetpartid-110030-15219548.pdf?src-supplier=Verical, ComponentLink5Description=https://datasheet.ciiva.com/8303/ds30086-8303197.pdf?src-supplier=Avnet, ComponentLink5URL=https://datasheet.ciiva.com/8303/ds30086-8303197.pdf?src-supplier=Avnet, ComponentLink6Description=https://datasheet.ciiva.com/911/ds30086-911735.pdf?src-supplier=Digi-Key, ComponentLink6URL=https://datasheet.ciiva.com/911/ds30086-911735.pdf?src-supplier=Digi-Key, ComponentLink7Description=https://datasheet.ciiva.com/911/ds30086-911736.pdf?src-supplier=Digi-Key, ComponentLink7URL=https://datasheet.ciiva.com/911/ds30086-911736.pdf?src-supplier=Digi-Key, ComponentLink8Description=https://datasheet.ciiva.com/911/ds30086-911734.pdf?src-supplier=Digi-Key, ComponentLink8URL=https://datasheet.ciiva.com/911/ds30086-911734.pdf?src-supplier=Digi-Key, ComponentLink9Description=https://datasheet.ciiva.com/4435/ds30086-4435128.pdf?src-supplier=Mouser, ComponentLink9URL=https://datasheet.ciiva.com/4435/ds30086-4435128.pdf?src-supplier=Mouser, Contact Plating=Tin,Matte, Element Configuration=Single, Forward Current=150mA, Height=1.25mm, Item Type=Diode, Lead Free="Lead Free", Length=2.85mm, Manufacturer Part Number=1N4148W-7-F, Max Reverse Voltage (DC)=100V, Max Surge Current=2A, Mounting Technology="Surface Mount", Output Current=150mA, Packaging="Tape and Reel", Peak Non-Repetitive Surge Current=2A, Pins=2, Polarity=Standard, Power Rating=400mW, Pricing 1="3000=0.01840, 12000=0.01760, 45000=0.01690, 120000=0.01640, 300000=0.01560 (USD)", Radiation Hardening=No, Reach SVHC Compliant=Yes, Recovery Time=4ns, Reverse Recovery Time=4ns, Reverse Recovery Time-Max=4ns, RoHS=Yes, RoHS Compliant=Yes, Series=-, Stock 1=32931000, Supplier 1="Future Electronics", Voltage=100V, Weight=0.000353oz, Width=1.7mm
D4 D5 D6: "1A 1000V 1.1V@2A DO-41 Diodes - General Purpose ROHS", LCSC Part Number=C3011149, Manufacturer=JUXING, Package=DO-41, ComponentLink1Description=LCSC, ComponentLink1URL=https://www.lcsc.com/product-detail/Diodes-General-Purpose_JUXING-1N4007_C3011149.html, Item Type=Diode, Manufacturer Part Number=1N4007
D7: "TVS DIODE 6.4VWM 11.3VC DO204AC", LCSC Part Number=C1975000, Manufacturer=Littelfuse, Reverse Voltage=6.4V, Supplier Part Number=9017454, Category="TVS Diodes", ComponentLink1Description=https://datasheet.ciiva.com/15143/getdatasheetpartid-152329-15143807.pdf?src-supplier=Verical, ComponentLink1URL=https://datasheet.ciiva.com/15143/getdatasheetpartid-152329-15143807.pdf?src-supplier=Verical, ComponentLink2Description=https://datasheet.ciiva.com/331/littelfuse-tvs-diode-p6ke-datasheet-pdf-331007.pdf?src-supplier=Digi-Key, ComponentLink2URL=https://datasheet.ciiva.com/331/littelfuse-tvs-diode-p6ke-datasheet-pdf-331007.pdf?src-supplier=Digi-Key, ComponentLink3Description=https://datasheet.ciiva.com/331/littelfuse-tvs-diode-p6ke-datasheet-pdf-331031.pdf?src-supplier=Digi-Key, ComponentLink3URL=https://datasheet.ciiva.com/331/littelfuse-tvs-diode-p6ke-datasheet-pdf-331031.pdf?src-supplier=Digi-Key, ComponentLink4Description=https://datasheet.ciiva.com/331/littelfuse-tvs-diode-p6ke-datasheet-pdf-331032.pdf?src-supplier=Digi-Key, ComponentLink4URL=https://datasheet.ciiva.com/331/littelfuse-tvs-diode-p6ke-datasheet-pdf-331032.pdf?src-supplier=Digi-Key, ComponentLink5Description=https://datasheet.ciiva.com/4510/littelfuse-tvs-diode-p6ke-48586-4510890.pdf?src-supplier=Mouser, ComponentLink5URL=https://datasheet.ciiva.com/4510/littelfuse-tvs-diode-p6ke-48586-4510890.pdf?src-supplier=Mouser, ComponentLink6Description=https://datasheet.ciiva.com/8062/littelfuse-tvs-diode-p6ke-8062215.pdf?src-supplier=Element14, ComponentLink6URL=https://datasheet.ciiva.com/8062/littelfuse-tvs-diode-p6ke-8062215.pdf?src-supplier=Element14, Item Type=Diode, Manufacturer Part Number=P6KE7.5A, Pricing="1=0.395, 15=0.325, 100=0.27, 400=0.235, 2000=0.189 (USD)", RoHS=Yes, Stock=2812, Supplier="Future Electronics"
J1: "320V 20A 8 Straight pin -40℃~+105℃ 1 5.08mm 1x8P Green Board Edge/Receptacle-Close Plugin,P=5.08mm Pluggable System Terminal Block ROHS", LCSC Part Number=C395784, Manufacturer=DIBO, Package=Plugin,P=5.08mm, ComponentLink1Description=LCSC, ComponentLink1URL=https://www.lcsc.com/product-detail/Pluggable-System-Terminal-Block_DIBO-DB2EVC-5-08-8P-GN_C395784.html, Item Type="Terminal Block", Manufacturer Part Number=DB2EVC-5.08-8P-GN
J2: "320V 20A 12 Straight pin -40℃~+105℃ 1 5.08mm 1x12P Green Board Edge/Receptacle-Close Plugin,P=5.08mm Pluggable System Terminal Block ROHS", LCSC Part Number=C395823, Manufacturer=DIBO, Package=Plugin,P=5.08mm, ComponentLink1Description=LCSC, ComponentLink1URL=https://www.lcsc.com/product-detail/Pluggable-System-Terminal-Block_DIBO-DB2EVC-5-08-12P-GN_C395823.html, Item Type="Terminal Block", Manufacturer Part Number=DB2EVC-5.08-12P-GN
J3: library part B-2100S03P-A110, "Straight 2.54mm Black Brass 1x3P Plugin,P=2.54mm Pin Headers ROHS", LCSC Part Number=C124376, Manufacturer=Ckmtw, ComponentLink1Description=LCSC, ComponentLink1URL=https://www.lcsc.com/product-detail/Pin-Headers_Ckmtw-Shenzhen-Cankemeng-B-2100S03P-A110_C124376.html, Item Type=Header, Manufacturer Part Number=B-2100S03P-A110
J4: "2.54mm Plugin 3A 2P Straight 1x2P 8.5mm Top Square Holes Plugin,P=2.54mm Female Headers ROHS", LCSC Part Number=C2935973, Manufacturer=DEALON, Package=Plugin,P=2.54mm, ComponentLink1Description=LCSC, ComponentLink1URL=https://www.lcsc.com/product-detail/span-style-background-color-ff0-Female-span-Headers_DEALON-DM254R-11-02-85_C2935973.html, Item Type=Header, Manufacturer Part Number=DM254R-11-02-85
J5: "CONN HEADER FEMALE 4POS .1 TIN", Flammability Rating="UL94 V-0", Insulation Color=Black, LCSC Part Number=C3319639, Manufacturer=Sullins, Max Operating Temperature=105°C, Min Operating Temperature=-40°C, Supplier Part Number 1=7137813, Voltage Rating=250V, Category=Connectors, ComponentLink1Description=https://media.digikey.com/pdf/Data%20Sheets/Sullins%20PDFs/Female_Headers.100_DS.pdf?src-supplier=Digi-Key, ComponentLink1URL=https://media.digikey.com/pdf/Data%20Sheets/Sullins%20PDFs/Female_Headers.100_DS.pdf?src-supplier=Digi-Key, ComponentLink2Description=http://www.sullinscorp.com/catalogs/78_Page80-81_HEADER_.100_2.54mm_FEMALE.pdf?src-supplier=Future+Electronics, ComponentLink2URL=http://www.sullinscorp.com/catalogs/78_Page80-81_HEADER_.100_2.54mm_FEMALE.pdf?src-supplier=Future+Electronics, Connector Type=Header, Contact Finish - Mating=TIN, Contact Material=Bronze, Contact Shape=Square, Contact Type="Female Socket", Fastening Type=Pull, Height=8.5mm, Housing Material=Plastic, Insulation Material=Polyester, Item Type=Header, Lead Free="Lead Free", Length=10.7mm, Manufacturer Part Number=PPTC041LFBN-RC, Mounting Technology="Through Hole", Number of Positions=4, Number of Rows=1, Packaging=Tray, Pitch=2.54mm, Pricing 1="1=0.28500, 150=0.27500, 400=0.26500, 1500=0.25500, 4000=0.23500 (USD)", RoHS=Yes, RoHS Compliant=Yes, Series=-, Stock 1=915, Supplier 1="Future Electronics", Termination=Solder, Width=2.5mm
J7: "Straight 2.54mm Black Brass 1x3P Plugin,P=2.54mm Pin Headers ROHS", LCSC Part Number=C124376, Manufacturer=Ckmtw, ComponentLink1Description=LCSC, ComponentLink1URL=https://www.lcsc.com/product-detail/Pin-Headers_Ckmtw-Shenzhen-Cankemeng-B-2100S03P-A110_C124376.html, Item Type=Header, Manufacturer Part Number=B-2100S03P-A110
J8: library part DM254R-11-02-85, "2.54mm Plugin 3A 2P Straight 1x2P 8.5mm Top Square Holes Plugin,P=2.54mm Female Headers ROHS", LCSC Part Number=C2935973, Manufacturer=DEALON, Package=Plugin,P=2.54mm, ComponentLink1Description=LCSC, ComponentLink1URL=https://www.lcsc.com/product-detail/span-style-background-color-ff0-Female-span-Headers_DEALON-DM254R-11-02-85_C2935973.html, Item Type=Header, Manufacturer Part Number=DM254R-11-02-85
J10: "Fuse Holder 6.3A 250VDC/250VAC Through Hole Pin", LCSC Part Number=C2760101, Manufacturer=Littelfuse, Supplier Part Number=9114913, Category="Fuse Holders", ComponentLink1Description=https://datasheet.ciiva.com/18456/ptf075-77-78-18456970.pdf?src-supplier=Digi-Key, ComponentLink1URL=https://datasheet.ciiva.com/18456/ptf075-77-78-18456970.pdf?src-supplier=Digi-Key, Item Type="Fuse Holder", Manufacturer Part Number=0PTF0078P, Pricing="2000=0.118, 6000=0.114, 10000=0.113, 20000=0.111, 40000=0.107 (USD)", RoHS=Yes, Stock=4000, Supplier="Future Electronics"
J#1 J#2: library part C50950, "2.54mm Plugin Straight 1x5P 5 Plugin,P=2.54mm Female Headers ROHS", Manufacturer=BOOMELE, Package=Plugin,P=2.54mm, ComponentLink1Description=LCSC, ComponentLink1URL=https://www.lcsc.com/product-detail/Female-Headers_BOOMELE-Boom-Precision-Elec-C50950_C50950.html, Item Type="Female Header", LCSC Part Number=C50950, Manufacturer Part Number=C50950
J#4: "1x2P 18A -40℃~+105℃ 250V Black 12~30 Straight pin 5.08mm 2.5 1 2 Plugin,P=5.08mm Screw terminal ROHS", LCSC Part Number=C430601, Manufacturer=DIBO, Package=Plugin,P=5.08mm, ComponentLink1Description=LCSC, ComponentLink1URL=https://www.lcsc.com/product-detail/Screw-terminal_span-style-background-color-ff0-DIBO-span-DB128L-5-08-2P-BK-S_C430601.html, Item Type="Terminal Block", Manufacturer Part Number=DB128L-5.08-2P-BK-S
J#5: "1x4P 1 2.54mm Male pin 4 -25℃~+85℃ 3A Straight Plugin,P=2.54mm Wire To Board / Wire To Wire Connector ROHS", LCSC Part Number=C2764792, Manufacturer=XFCN, Package=Plugin,P=2.54mm, ComponentLink1Description=LCSC, ComponentLink1URL=https://www.lcsc.com/product-detail/Wire-To-Board-Wire-To-Wire-Connector_XFCN-M2510V-04P_C2764792.html, Item Type="Wire To Board Connector", Manufacturer Part Number=M2510V-04P
K1 K2 K3: "RELAY GEN PURPOSE SPST 16A 12V", LCSC Part Number=C231374, Manufacturer=Omron, Supplier Part Number=6839227, Category="Power Relays", ComponentLink1Description=https://omronfs.omron.com/en_US/ecb/products/pdf/en-g5rl.pdf?src-supplier=Digi-Key, ComponentLink1URL=https://omronfs.omron.com/en_US/ecb/products/pdf/en-g5rl.pdf?src-supplier=Digi-Key, ComponentLink2Description=http://datasheet.octopart.com/G5RL-1A-E-HR-DC12-Omron-datasheet-10910182.pdf?src-supplier=Mouser, ComponentLink2URL=http://datasheet.octopart.com/G5RL-1A-E-HR-DC12-Omron-datasheet-10910182.pdf?src-supplier=Mouser, ComponentLink3Description=http://datasheet.octopart.com/G5RL-1A-E-HR-DC12-Omron-datasheet-10910182.pdf?src-supplier=Farnell, ComponentLink3URL=http://datasheet.octopart.com/G5RL-1A-E-HR-DC12-Omron-datasheet-10910182.pdf?src-supplier=Farnell, ComponentLink4Description=http://datasheet.octopart.com/G5RL-1A-E-HR-DC12-Omron-datasheet-10910182.pdf?src-supplier=Avnet, ComponentLink4URL=http://datasheet.octopart.com/G5RL-1A-E-HR-DC12-Omron-datasheet-10910182.pdf?src-supplier=Avnet, ComponentLink5Description=http://datasheet.octopart.com/G5RL-1A-E-HR-DC12-Omron-datasheet-10910182.pdf?src-supplier=Digi-Key, ComponentLink5URL=http://datasheet.octopart.com/G5RL-1A-E-HR-DC12-Omron-datasheet-10910182.pdf?src-supplier=Digi-Key, ComponentLink6Description=http://datasheet.octopart.com/G5RL-1A-E-HR-DC12-Omron-datasheet-10910182.pdf?src-supplier=Arrow+Electronics, ComponentLink6URL=http://datasheet.octopart.com/G5RL-1A-E-HR-DC12-Omron-datasheet-10910182.pdf?src-supplier=Arrow+Electronics, ComponentLink7Description=http://datasheet.octopart.com/G5RL-1A-E-HR-DC12-Omron-datasheet-10910182.pdf?src-supplier=Onlinecomponents.com, ComponentLink7URL=http://datasheet.octopart.com/G5RL-1A-E-HR-DC12-Omron-datasheet-10910182.pdf?src-supplier=Onlinecomponents.com, ComponentLink8Description=http://datasheet.octopart.com/G5RL-1A-E-HR-DC12-Omron-datasheet-10910182.pdf?src-supplier=Newark, ComponentLink8URL=http://datasheet.octopart.com/G5RL-1A-E-HR-DC12-Omron-datasheet-10910182.pdf?src-supplier=Newark, ComponentLink9Description=https://datasheet.octopart.com/G5RL-1A-E-HR-DC12-Omron-datasheet-87796980.pdf?src-supplier=Master+Electronics, ComponentLink9URL=https://datasheet.octopart.com/G5RL-1A-E-HR-DC12-Omron-datasheet-87796980.pdf?src-supplier=Master+Electronics, ComponentLink10Description=http://datasheet.octopart.com/G5RL-1A-E-HR-DC12-Omron-datasheet-10910182.pdf?src-supplier=LCSC, ComponentLink10URL=http://datasheet.octopart.com/G5RL-1A-E-HR-DC12-Omron-datasheet-10910182.pdf?src-supplier=LCSC, ComponentLink11Description=http://datasheet.octopart.com/G5RL-1A-E-HR-DC12-Omron-datasheet-10910182.pdf?src-supplier=Today+Components, ComponentLink11URL=http://datasheet.octopart.com/G5RL-1A-E-HR-DC12-Omron-datasheet-10910182.pdf?src-supplier=Today+Components, Item Type=Relay, Manufacturer Part Number=G5RL-1A-E-HRDC12, Pricing="1=4.64, 25=3.67, 50=3.47, 100=3.31, 250=2.96 (GBP)", RoHS=Yes, Stock=213, Supplier=Rs
LED15 LED16 LED17 LED18 LED19 LED20 LED21 LED22: library part NCD0603B3, "blue 0603 Light Emitting Diodes (LED) ROHS", LCSC Part Number=C158101, Manufacturer="Foshan NationStar Optoelectronics", Package=0603, ComponentLink1Description=LCSC, ComponentLink1URL=https://www.lcsc.com/product-detail/Light-Emitting-Diodes-LED_Foshan-NationStar-Optoelectronics-NCD0603B3_C158101.html, Item Type=LED, Manufacturer Part Number=NCD0603B3
Q1 Q2: "TRIAC Standard 600V 16A Through Hole TO-220AB", Manufacturer=STMicroelectronics, Supplier Part Number=511-BTA16-600B, Category=TRIACs, ComponentLink1Description=https://datasheet.ciiva.com/15140/getdatasheetpartid-185587-15140605.pdf?src-supplier=Verical, ComponentLink1URL=https://datasheet.ciiva.com/15140/getdatasheetpartid-185587-15140605.pdf?src-supplier=Verical, ComponentLink2Description=https://datasheet.ciiva.com/3054/cd00002265-3054339.pdf?src-supplier=Avnet, ComponentLink2URL=https://datasheet.ciiva.com/3054/cd00002265-3054339.pdf?src-supplier=Avnet, ComponentLink3Description=https://datasheet.ciiva.com/16397/cd00002265-16397087.pdf?src-supplier=Future+Electronics, ComponentLink3URL=https://datasheet.ciiva.com/16397/cd00002265-16397087.pdf?src-supplier=Future+Electronics, ComponentLink4Description=https://datasheet.ciiva.com/1218/1699992-1218264.pdf?src-supplier=Farnell, ComponentLink4URL=https://datasheet.ciiva.com/1218/1699992-1218264.pdf?src-supplier=Farnell, ComponentLink5Description=https://datasheet.ciiva.com/14164/tfstm-triacs-bta-btb-16-xxx-en-14164139.pdf?src-supplier=Distrelec, ComponentLink5URL=https://datasheet.ciiva.com/14164/tfstm-triacs-bta-btb-16-xxx-en-14164139.pdf?src-supplier=Distrelec, ComponentLink6Description=https://datasheet.ciiva.com/4748/cd00002265-4748742.pdf?src-supplier=Mouser, ComponentLink6URL=https://datasheet.ciiva.com/4748/cd00002265-4748742.pdf?src-supplier=Mouser, ComponentLink7Description=https://datasheet.ciiva.com/1197/1699992-1197134.pdf?src-supplier=Element14, ComponentLink7URL=https://datasheet.ciiva.com/1197/1699992-1197134.pdf?src-supplier=Element14, ComponentLink8Description=https://datasheet.ciiva.com/1198/1699992-1198139.pdf?src-supplier=Element14, ComponentLink8URL=https://datasheet.ciiva.com/1198/1699992-1198139.pdf?src-supplier=Element14, Item Type=TRIAC, Manufacturer Part Number=BTA16-600BRG, Pricing="1=2.4, 10=2.14, 50=2.14, 100=1.74, 1000=1.2, 10000=1.11 (USD)", RoHS=Yes, Stock=13093, Supplier=Mouser
Q4 Q5 Q6 Q7: "45V 300mW 100@100mA,1V 500mA NPN SOT-23 Bipolar Transistors - BJT ROHS", LCSC Part Number=C371086, Manufacturer=DOWO, Package=SOT-23, ComponentLink1Description=LCSC, ComponentLink1URL=https://www.lcsc.com/product-detail/Bipolar-Transistors-BJT_DOWO-BC817-6B-160-400_C371086.html, Item Type=Transistor, Manufacturer Part Number="BC817 6B 160-400"
R1 R2 R5 R6: library part TH390R, "Metal Oxide Resistors 390Ω 1W ±350ppm/℃ ±5% Plugin Through Hole Resistors ROHS", ComponentLink1Description=LCSC, ComponentLink1URL=https://www.lcsc.com/product-detail/Through-Hole-Resistors_VO-MO1W-390-5-6T63_C479244.html
R3 R4: library part MFR50S-T-52-0R, "Metal Film Resistors 0Ω 500mW Plugin Through Hole Resistors ROHS", LCSC Part Number=C173163, Manufacturer=YAGEO, Package=Plugin, ComponentLink1Description=LCSC, ComponentLink1URL=https://www.lcsc.com/product-detail/Through-Hole-Resistors_YAGEO-MFR50S-T-52-0R_C173163.html, Item Type="Through Hole Resistor", Manufacturer Part Number=MFR50S-T-52-0R
R7 R8 R9: library part RT0603DRD071KL, "RES SMD 1K OHM 0.5% 1/10W 0603", Case Code (Imperial)=0603, Case Code (Metric)=1608, LCSC Part Number=C165964, Manufacturer=Yageo, Max Operating Temperature=125°C, Min Operating Temperature=-55°C, Power Rating=100mW, Resistance=1kR, Supplier Part Number 1=311-1.0KDDKR-ND, Temperature Coefficient=25ppm/°C, Tolerance=0.5%, Voltage Rating=75V, Voltage Rating (DC)=50V, Case/Package=0603, ComponentLink1Description=http://www.mouser.com/ds/2/447/yageodocoutput-1125656.pdf?src-supplier=Mouser, ComponentLink1URL=http://www.mouser.com/ds/2/447/yageodocoutput-1125656.pdf?src-supplier=Mouser, ComponentLink2Description=http://www.yageo.com/documents/recent/PYu-RT_1-to-0.05_RoHS_L_6.pdf?src-supplier=Avnet, ComponentLink2URL=http://www.yageo.com/documents/recent/PYu-RT_1-to-0.05_RoHS_L_6.pdf?src-supplier=Avnet, Composition="Thin Film", Contact Plating=Tin,Matte, Lead Free="Lead Free", Manufacturer Part Number=RT0603DRD071KL, Packaging="Tape and Reel", Pricing 1="1=0.2, 10=0.167, 100=0.0651, 1000=0.02725, 2500=0.02498 (USD)", Radiation Hardening=No, Stock 1=178947, Supplier 1=Digi-Key, Termination=SMD/SMT
R10 R33 R34 R35 R36 R38: library part RC0603FR-071K5L, "RES 1.5K OHM 1% 1/10W 0603", Case Code (Imperial)=0603, Case Code (Metric)=1608, LCSC Part Number=C114668, Manufacturer=Yageo, Max Operating Temperature=155°C, Max Power Dissipation=100mW, Min Operating Temperature=-55°C, Package Quantity=1, Resistance=1.5kR, Resistance Tolerance=1%, Resistor Type="Thick Film", Temperature Coefficient=100ppm/°C, Voltage Rating=50V, Case/Package=0603, Category="Chip SMD Resistors", Construction=Rectangular, Depth=0.8mm, Features="Moisture Resistant", Height=0.022inch, Item Type=Resistor, Lead Free="Lead Free", Length=0.063inch, Manufacturer Part Number=RC0603FR-071K5L, Military Standard=Not, Number of Pins=2, Number of Terminations=2, Packaging="Tape and Reel", Power Rating=100mW, Pricing 1="1=0.00160, 5000=0.00160 (USD)", REACH SVHC="No SVHC", RoHS=Yes, RoHS Compliant=Yes, Series=RC, Size Code=0603, Stock 1=15000, Supplier 1="Arrow Electronics", Supplier Part Number 1=RC0603FR-071K5L, Termination=SMD/SMT, Tolerance=1%, Voltage Rating (DC)=50V, Width=0.031inch
R11 R16 R25 R29: library part RC0603JR-07100KL, "RES 100K OHM 5% 1/10W 0603", Case Code (Imperial)=0603, Case Code (Metric)=1608, LCSC Part Number=C100048, Manufacturer=Yageo, Max Operating Temperature=155°C, Max Power Dissipation=100mW, Min Operating Temperature=-55°C, Resistance=100kR, Resistance Tolerance=5%, Resistor Type="Thick Film", Supplier Part Number 1=311-100KGRCT-ND, Temperature Coefficient=100ppm/°C, Voltage Rating=50V, Case/Package=0603, Category="Chip SMD Resistors", ComponentLink1Description=https://datasheet.ciiva.com/7746/443971-7746424.pdf?src-supplier=Element14, ComponentLink1URL=https://datasheet.ciiva.com/7746/443971-7746424.pdf?src-supplier=Element14, ComponentLink2Description=https://datasheet.ciiva.com/7983/443971-7983686.pdf?src-supplier=Element14, ComponentLink2URL=https://datasheet.ciiva.com/7983/443971-7983686.pdf?src-supplier=Element14, ComponentLink3Description=https://datasheet.ciiva.com/7746/443971-7746423.pdf?src-supplier=Element14, ComponentLink3URL=https://datasheet.ciiva.com/7746/443971-7746423.pdf?src-supplier=Element14, ComponentLink4Description=https://datasheet.ciiva.com/8887/pyu-rc0603-51-rohs-l-4-8887903.pdf?src-supplier=Avnet, ComponentLink4URL=https://datasheet.ciiva.com/8887/pyu-rc0603-51-rohs-l-4-8887903.pdf?src-supplier=Avnet, Contact Plating=Tin,Matte, Features="Moisture Resistant", Item Type=Resistor, Lead Free="Lead Free", Manufacturer Part Number=RC0603JR-07100KL, Number of Pins=2, Number of Terminations=2, Packaging="Tape and Reel", Power Rating=100mW, Pricing 1="1=0.10000, 10=0.02000, 100=0.00800, 1000=0.00360, 2500=0.00312 (USD)", Radiation Hardening=No, REACH SVHC="No SVHC", RoHS=Yes, RoHS Compliant=Yes, Series=RC, Size Code=0603, Stock 1=1210037, Supplier 1=Digi-Key, Termination=SMD/SMT, Tolerance=5%, Voltage Rating (DC)=50V, Width=0.8mm